# Altium PCB AmbientPro_Main_Board_V1.0.PcbDoc (part 4 of 5)
Units mm, origin at the board's own origin, x right, y up, seen from the top; angles counter-clockwise.
Board outline 100 x 100 mm, 4 copper layers (Top Layer, GND, PWR, Bottom Layer), stack 1.566 mm thick; 176 components, 124 nets, 570 pads, 283 vias.
Unrouted connection lines stored in the file: 133.
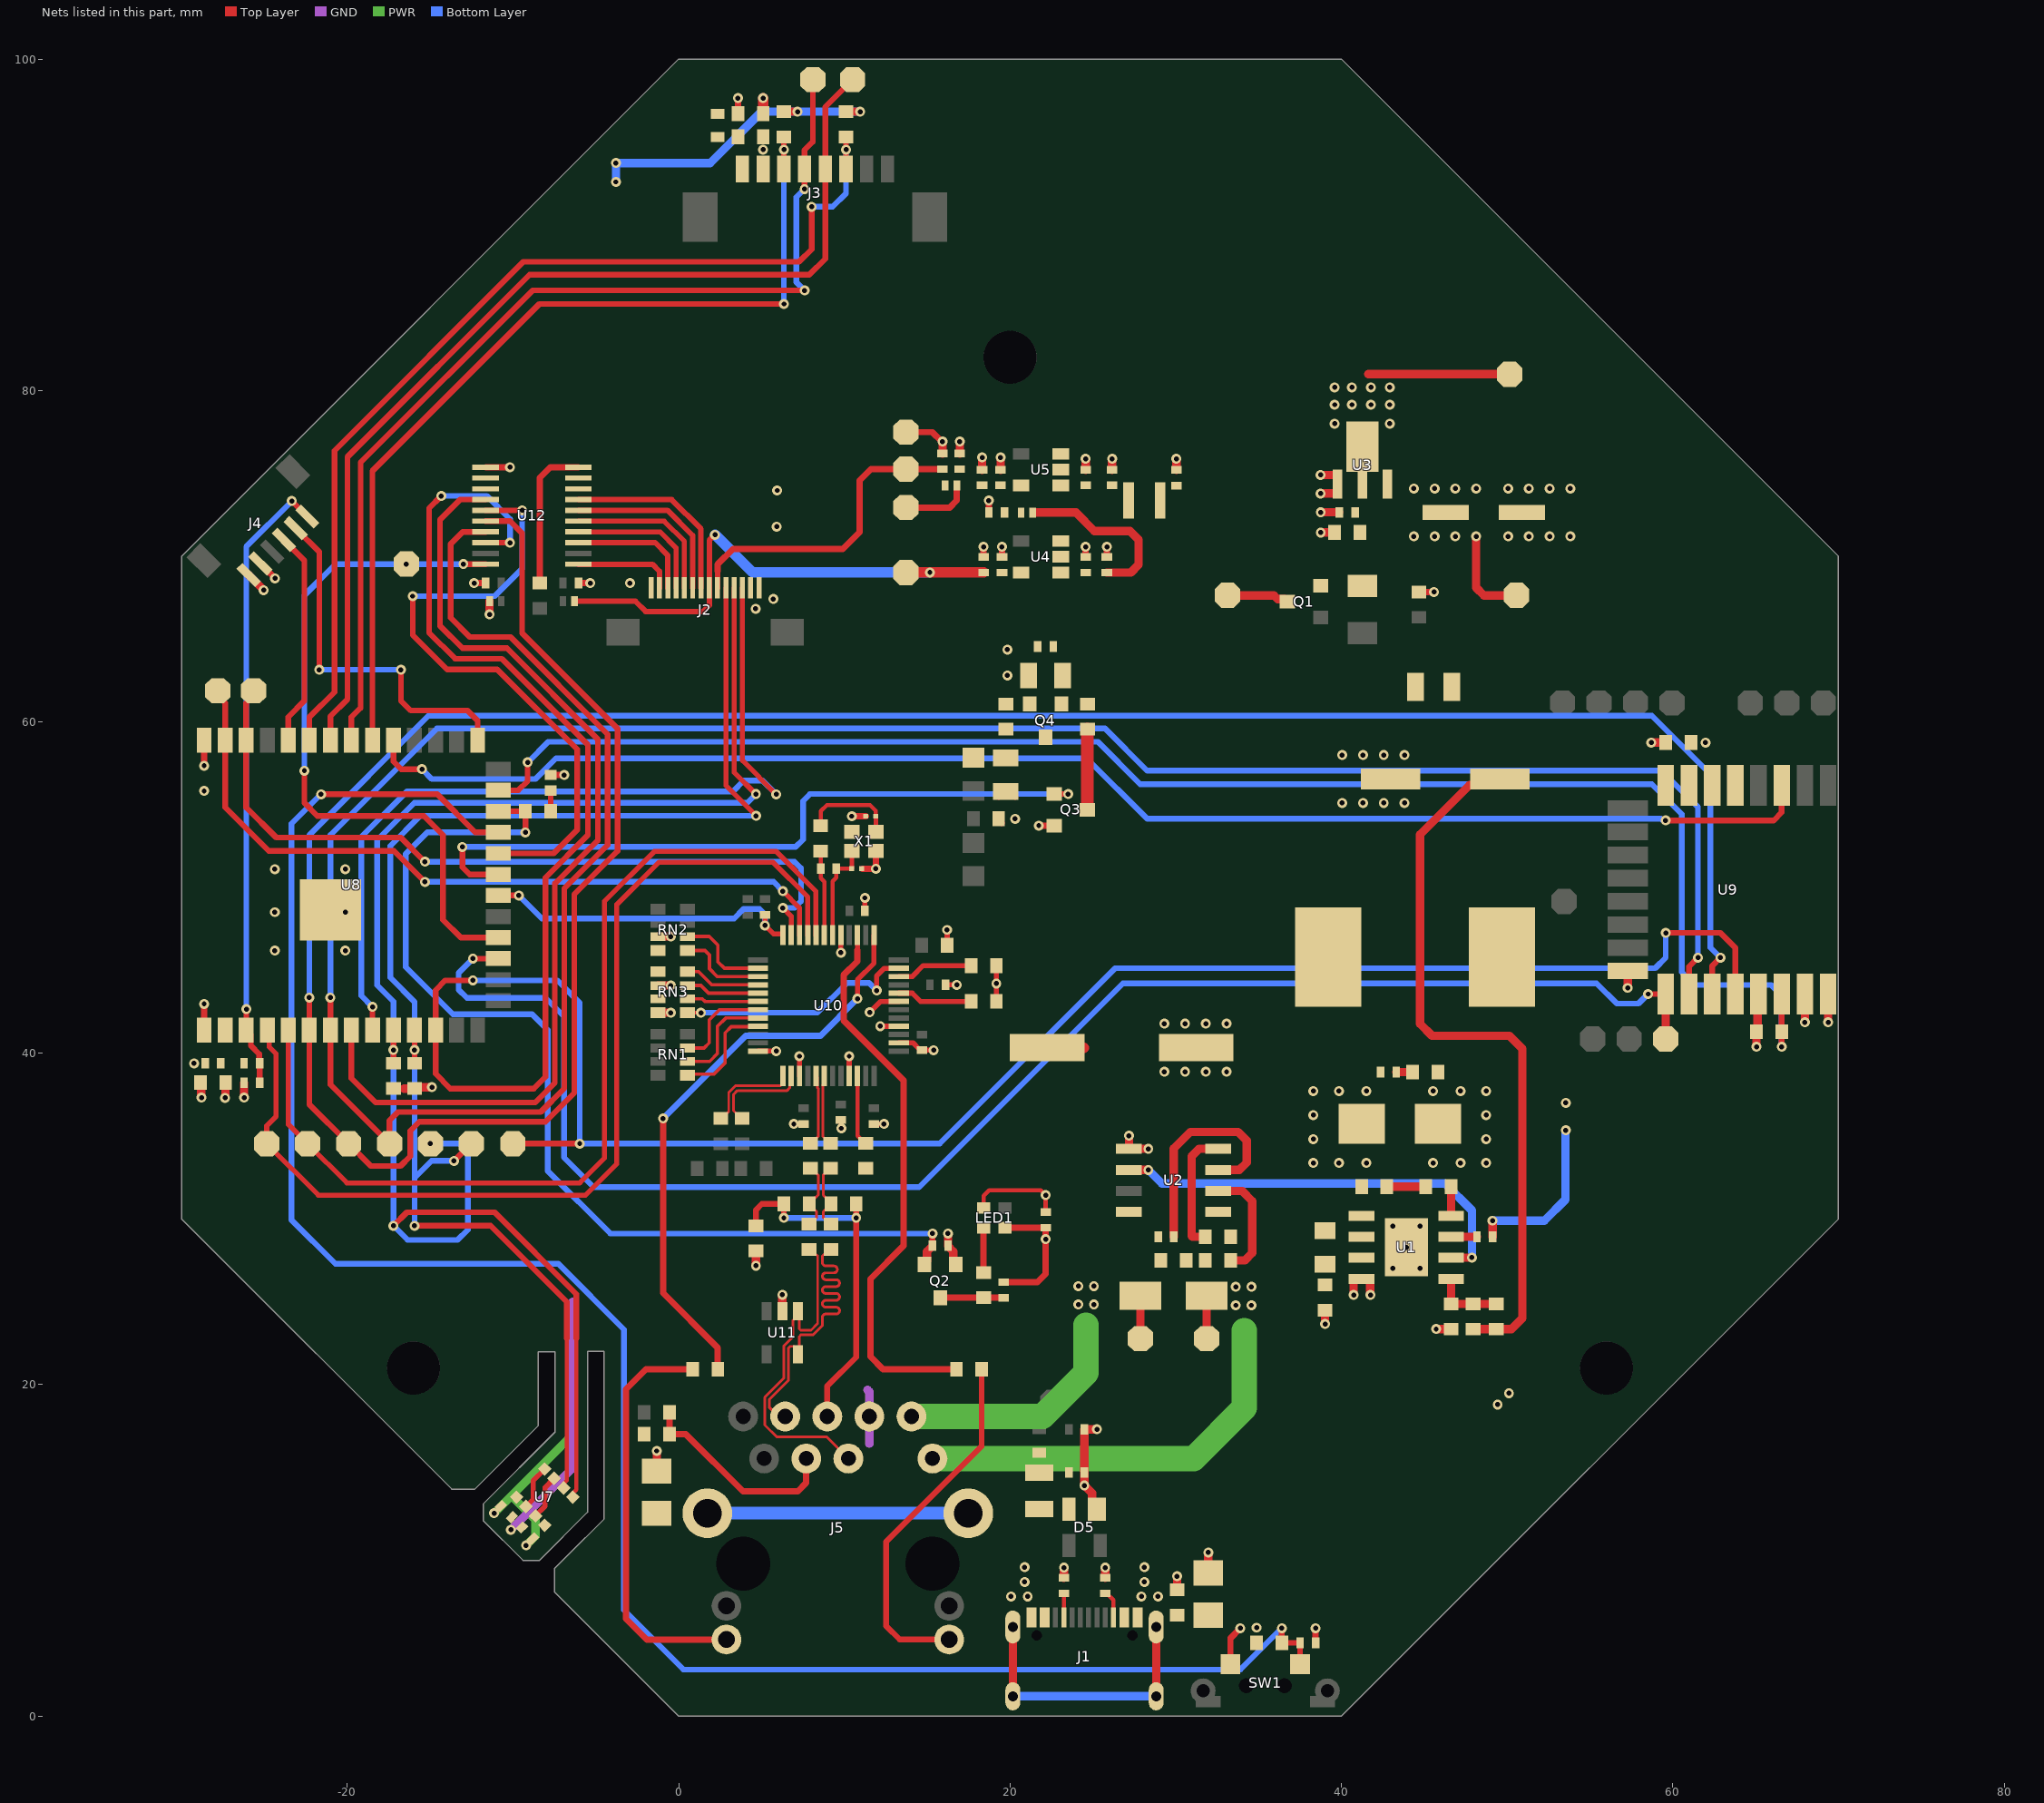
[diagram p4: the nets of this part, all layers, seen from the top]

## Via types
v1: diameter 0.6, hole 0.3, Top Layer to Bottom Layer, 283 vias

## Nets (pads, with @x,y where several pads share a name; then routed paths per layer and width w, separated by ;. In a path a pad name is that pad's centre, name@x,y a point inside that pad or via, vN(x,y) a via of type N, cw(c..) or ccw(c..) an arc to the next point about the centre after c; other vN are vias at no path point) (continued)
GND: (continued)
  Top Layer w0.508: C30.1@-28.866,38.227 -28.821,38.181 -28.821,37.346 v1(-28.803,37.328) ; v1(-26.231,37.328) C33.1@-26.231,38.227 ; C54.1@-1.321,14.78 v1(-1.321,16.002) ; RN3.4@-1.239,42.448 v1(-0.473,42.448) ; RN3.2@-1.239,44.088 v1(-0.475,44.088) ; RN2.3@-1.239,47.045 -1.237,47.043 -1.234,47.046 v1(-0.473,47.046) ; v1(4.664,27.178) C48.1@4.664,28.067 ; U11.2@6.254,24.444 v1(6.254,25.425) ; C17.1@15.926,76.187 v1(15.926,76.911) ; C23.1@16.967,76.187 v1(16.967,76.911) ; C22.1@18.313,75.209 v1(18.313,75.959) ; C21.1@19.431,75.209 v1(19.431,75.959) ; R12.1@23.246,8.344 23.251,8.349 23.251,8.948 v1(23.256,8.953) ; v1(24.486,13.919) C6.1@24.486,14.69 C7.1@24.486,17.304 v1(25.247,17.304) ; v1@24.504,13.902 24.951,13.455 24.951,12.786 D5.1@25.247,12.49 ; C20.1@24.562,75.209 v1(24.562,75.87) ; R11.1@25.746,8.344 v1(25.746,8.953) ; C19.1@26.162,75.209 v1(26.162,75.87) ; v1(27.178,35.027) 27.178,34.241 U2.5@27.168,34.232 v1(28.346,34.232) ; C18.1@30.038,75.201 v1(30.038,75.87) ; v1(30.074,8.433) 30.081,8.426 30.081,7.63 R13.2@30.088,7.623 ; C11.2@31.967,8.639 v1(31.967,9.881) ; v1(38.746,73.78) 39.731,73.78 39.731,74.899 v1(38.746,74.899) ; v1(38.751,71.426) C9.2@39.591,71.426 ; v1(38.751,72.645) C10.1@39.864,72.645 ; v1(39.016,23.664) R3.1@39.016,24.499 ; v1(40.741,25.417) 40.741,26.34 40.787,26.386 U1.4@41.222,26.386 41.697,26.386 41.743,26.34 41.743,25.431 v1(41.757,25.417) ; v1(45.72,23.36) 45.724,23.356 46.618,23.356 R8.1@46.622,23.352 ; v1(57.282,43.942) U9.16@57.282,44.967 ; v1(58.699,58.75) C35.2@59.577,58.75 ; v1(65.053,40.386) R25.1@65.053,41.3 65.115,41.362 65.115,43.51 U9.21@65.177,43.572 ; v1(67.977,41.868) U9.23@67.977,43.572 ; v1(69.377,41.868) U9.24@69.377,43.572
  Top Layer w0.635: C25.1@5.1,96.701 v1(5.1,97.638)
  GND w0.508: v1(-10.129,11.248) -6.484,14.894 -6.484,24.911 -6.401,24.994 ; 11.405,19.685 11.51,19.58 J5.7@11.51,18.08 11.51,16.44
  other v1: 20.061,7.214 28.931,7.214 21.063,7.216 27.928,7.216 45.537,33.376 47.189,33.376 48.74,33.376 48.74,34.823 48.74,36.271 45.537,37.719 47.189,37.719 48.74,37.719 29.312,38.887 30.565,38.887 31.818,38.887 33.071,38.887 -29.247,39.395 29.312,41.783 30.565,41.783 31.818,41.783 33.071,41.783 19.174,44.208 -24.384,46.198 -20.117,46.198 -24.384,48.514 -20.117,48.514 -24.384,51.105 -20.117,51.105 20.308,54.153 40.051,55.102 41.304,55.102 42.557,55.102 43.81,55.102 -28.644,55.829 40.051,57.998 41.304,57.998 42.557,57.998 43.81,57.998 4.639,66.826 5.715,67.412 50.062,71.189 51.315,71.189 52.568,71.189 53.821,71.189 5.918,71.78 5.944,73.965 50.062,74.085 51.315,74.085 52.568,74.085 53.821,74.085 5.1,94.539
GPIO12: R36.2 U8.20 U10.36 | length 19.7
  Top Layer w0.305: v1@5.204,47.719 R36.2@5.204,48.36 ; v1(5.207,47.719) 5.722,47.204 6.282,47.204 6.282,47.135 U10.36@6.29,47.128
  Top Layer w0.345: U8.20@-10.884,49.521 v1(-9.652,49.521)
  Bottom Layer w0.345: v1(-9.652,49.521) -8.264,48.133 3.342,48.133 3.913,48.703 4.889,48.703 5.207,48.385 v1(5.207,47.719)
GPIO13: Q3.1 U8.21 | length 43.7
  Top Layer w0.345: v1(-13.056,52.451) -13.056,51.231 -12.616,50.791 U8.21@-10.884,50.791 ; Q3.1@22.672,55.643 v1(23.505,55.643)
  Bottom Layer w0.345: v1(-13.056,52.451) 7.062,52.451 7.512,52.901 7.512,55.225 7.929,55.643 v1(23.505,55.643)
GPIO16: J2.12 U8.9 | length 52
  Top Layer w0.305: J2.12@3.845,68.092 3.845,57.674 v1(5.893,55.626)
  Top Layer w0.345: U8.9@-18.484,41.401 v1(-18.484,42.799)
  Bottom Layer w0.345: v1(-18.484,42.799) -19.155,43.471 -19.155,53.05 -16.402,55.804 3.279,55.804 3.934,56.46 5.059,56.46 v1(5.893,55.626)
GPIO21: C34.2 R21.1 SW1.1 U8.23 | length 123.7
  Top Layer w0.345: v1(-21.59,55.626) -14.569,55.626 -12.274,53.331 U8.23@-10.884,53.331 ; v1(36.404,5.306) R21.1@36.404,4.42 C34.2@37.503,4.42 SW1.1@37.503,2.725
  Bottom Layer w0.345: v1(-21.59,55.626) -23.368,53.848 -23.368,29.937 -20.719,27.288 -7.257,27.288 -3.302,23.332 -3.302,6.401 0.29,2.808 33.907,2.808 v1(36.404,5.306)
GPIO38: U8.31 U9.3 | length 89.4
  Top Layer w0.345: U8.31@-17.214,58.901 -17.214,57.6 -16.755,57.141 v1(-15.494,57.141) ; v1(59.563,54.051) 66.093,54.051 66.577,54.535 U9.3@66.577,56.162
  Bottom Layer w0.345: v1(-15.494,57.141) -14.904,56.552 -8.65,56.552 -7.402,57.8 24.632,57.8 28.282,54.151 59.283,54.151 59.334,54.1 59.514,54.1 v1(59.563,54.051)
GPIO39: J3.3 R15.2 U8.32 | length 56.5
  Top Layer w0.345: U8.32@-18.484,58.901 -18.484,75.141 -8.407,85.217 v1(6.35,85.217) ; J3.3@6.35,93.365 v1(6.35,94.539) R15.2@6.35,95.301
  Bottom Layer w0.345: v1(6.35,85.217) v1(6.35,94.539)
GPIO40: J3.4 P12.1 U8.33 | length 61.4
  Top Layer w0.345: U8.33@-19.754,58.901 -19.754,60.282 -19.202,60.833 -19.202,75.642 -8.807,86.037 v1@7.569,86.037 ; v1(7.595,92.151) 7.597,92.154 J3.4@7.597,93.365 ; J3.4@7.6,93.365 7.6,94.502 8.095,94.997 P12.1@8.095,98.755
  Bottom Layer w0.345: v1(7.595,92.151) 7.105,91.662 7.105,86.532 v1(7.6,86.037)
GPIO41: J3.5 P11.1 U8.34 | length 62.8
  Top Layer w0.345: U8.34@-21.024,58.901 -21.024,60.332 -19.99,61.366 -19.99,75.991 -9.004,86.977 7.881,86.977 8.85,87.946 J3.5@8.85,93.365 8.85,97.105 P11.1@10.5,98.755
GPIO42: J3.6 R14.2 U8.35 | length 61.5
  Top Layer w0.345: U8.35@-22.294,58.901 -22.294,60.282 -20.777,61.798 -20.777,76.363 -9.376,87.764 7.272,87.764 8.026,88.519 v1(8.026,91.084) ; J3.6@10.1,93.365 v1(10.1,94.539) R14.2@10.1,95.301
  Bottom Layer w0.345: v1(8.026,91.084) 9.296,91.084 10.1,91.888 v1(10.1,94.539)
GPIO47: Q2.2 R18.2 R22.1 U8.24 | length 62.9
  Top Layer w0.344: U8.24@-10.884,54.601 R22.1@-9.251,54.601 v1(-9.251,53.331)
  Top Layer w0.345: R18.2@15.316,28.397 v1(15.316,29.119)
  Top Layer w0.508: Q2.2@14.836,27.248 14.836,27.298 14.992,27.454 14.992,28.035 R18.2@15.291,28.334
  Bottom Layer w0.344: v1(-9.251,53.331) -15.17,53.331 -16.471,52.031 -16.471,45.201 -13.622,42.353 -8.848,42.353 -7.899,41.404 -7.899,32.893 -4.126,29.119 v1(15.316,29.119)
GPIO48: R25.2 U8.25 U9.22 | length 97.5
  Top Layer w0.345: U8.25@-10.884,55.871 -9.683,55.871 -9.119,56.436 v1(-9.119,57.556) ; v1(66.577,40.386) R25.2@66.577,41.3 U9.22@66.577,43.572
  Bottom Layer w0.345: v1(-9.119,57.556) -7.88,58.795 25.305,58.795 27.861,56.238 58.74,56.238 60.554,54.424 60.554,44.904 61.337,44.12 65.938,44.12 66.577,43.481 v1(66.577,40.386)
IO0: J4.5 U8.27 | length 22.2
  Top Layer w0.345: J4.5@-23.123,71.685 -21.692,70.254 v1(-21.692,63.144) ; v1(-16.764,63.144) -16.764,61.282 -16.163,60.681 -12.737,60.681 -12.134,60.078 U8.27@-12.134,58.901
  Bottom Layer w0.345: v1(-21.692,63.144) v1(-16.764,63.144)
LAN_PWR_N: C3.1 D2.2 J5.10 P3.1 R6.1 R7.1 U2.4 | length 34.8
  Top Layer w0.508: R6.1@31.793,28.923 31.011,28.923 30.957,28.977 30.957,33.783 31.416,34.241 32.559,34.241 U2.4@32.568,34.232 ; P3.1@31.868,22.776 D2.2@31.868,25.367
  PWR w1.524: J5.10@15.32,15.54 31.085,15.54 34.14,18.595 34.14,23.27
  other v1: 33.63,24.79 34.569,24.79 33.63,25.908 34.569,25.908
LAN_PWR_P: C2.1 C3.2 D2.1 J5.9 P1.1 R2.2 R3.2 R4.2 U1.3 U2.8 | length 19.3
  Top Layer w0.508: P1.1@27.868,22.776 D2.1@27.868,25.367
  Top Layer w0.635: C2.1@22.241,40.335 C2.1@24.46,40.335
  PWR w1.524: J5.9@14.05,18.08 21.961,18.08 24.587,20.706 24.587,23.597
  other v1: 24.121,24.834 25.061,24.834 24.121,25.951 25.061,25.951
NetC1_1: C1.1 D3.2 L1.1 R16.2 U1.1
  other v1: 38.303,33.376 39.854,33.376 41.506,33.376 38.303,34.823 38.303,36.271 38.303,37.719 39.854,37.719 41.506,37.719
NetC1_2: C1.2 R1.1 | length 2.4
  Top Layer w0.508: C1.2@42.746,31.948 R1.1@45.098,31.948
NetC4_1: C4.1 R5.1 R8.2 U1.5 | length 4.2
  Top Layer w0.508: U1.5@46.622,26.386 R8.2@46.622,24.876 R5.1@47.953,24.876 C4.1@49.35,24.876
NetC4_2: C4.2 C5.1 F1.1 L1.2 R5.2 | length 43.9
  Top Layer w0.508: R5.2@47.953,23.352 C4.2@49.35,23.352 50.266,23.352 50.927,24.012 50.927,40.278 50.146,41.059 45.474,41.059 44.754,41.779 44.754,53.193 47.735,56.174 49.194,56.174 C5.1@49.57,56.55
NetC6_2: C6.2 F2.2 FB1.1
NetC11_1: C11.1 J1.S1 J1.S2 J1.S3 J1.S4 R13.1 | length 17
  Top Layer w0.508: J1.S3@20.171,1.197 J1.S4@20.171,5.377 ; J1.S2@28.821,1.197 J1.S1@28.821,5.377
  Bottom Layer w0.508: J1.S3@20.171,1.197 J1.S2@28.821,1.197
NetC13_2: C13.2 C14.2 FB2.2 U4.1 U4.3 | length 10.6
  Top Layer w0.508: FB2.2@21.438,72.631 23.977,72.631 25.094,71.514 27.24,71.514 27.762,70.991 27.762,69.486 27.288,69.012 C13.2@25.845,69.012
NetC19_2: C19.2 C20.2 L2.2 U5.1 U5.3
NetC24_2: C24.2 FB4.2 J3.1
NetC28_2: C28.2 R16.1 | length 1
  Top Layer w0.508: R16.1@43.307,38.862 C28.2@44.298,38.862
NetC36_1: C36.1 Q4.1 R26.1 R27.2
NetC37_2: C37.2 FB5.1 Q4.3 R28.2
NetC46_2: C46.2 R29.1 R33.2 | length 4.3
  Top Layer w0.16: C46.2@7.872,29.686 7.935,29.686 8.316,30.067 8.316,30.447 8.223,30.541 8.173,30.541 7.872,30.842 7.872,30.969 8.173,31.27 8.236,31.27 8.438,31.471 8.438,32.624 8.013,33.048 R29.1@7.95,33.048
NetC47_2: C47.2 R30.1 R32.2 | length 4.2
  Top Layer w0.16: R30.1@9.169,33.048 9.106,33.048 8.725,32.667 8.725,31.434 9.19,30.969 9.19,30.842 8.889,30.541 8.825,30.541 8.725,30.44 8.725,30.088 9.126,29.686 C47.2@9.19,29.686
NetC48_2: C48.2 J5.5 R32.1 R33.1 | length 21.5
  Top Layer w0.345: C48.2@4.664,29.591 4.664,30.541 5.028,30.905 R33.1@6.348,30.905 v1(6.348,30.067) ; J5.5@8.97,18.08 8.97,19.916 10.714,21.659 v1(10.714,30.067) R32.1@10.714,30.905
  Bottom Layer w0.345: v1(6.348,30.067) v1(10.714,30.067)
NetC49_1: C49.1 J5.4 R39.1 | length 12.7
  Top Layer w0.381: R39.1@-0.559,18.334 C49.1@-0.559,17.018 0.421,17.018 3.873,13.566 7.195,13.566 7.7,14.071 J5.4@7.7,15.54
NetC50_2: C50.2 U10.22 | length 4.6
  Top Layer w0.305: U10.22@13.29,44.628 14.103,44.628 14.763,45.288 C50.2@17.65,45.288
NetC51_2: C51.2 U10.20 | length 4.6
  Top Layer w0.305: U10.20@13.291,43.627 14.096,43.627 14.595,43.128 C51.2@17.65,43.128
NetC52_2: C52.2 R40.1 U10.30 X1.1 | length 6.1
  Top Layer w0.254: U10.30@9.29,47.128 9.29,50.367 9.512,50.59 R40.1@9.512,51.14 C52.2@10.452,51.14 X1.1@10.452,52.206
NetC53_2: C53.2 R42.1 X1.3 | length 5.8
  Top Layer w0.254: R42.1@8.573,53.73 8.586,53.743 8.586,54.621 8.951,54.986 11.55,54.986 11.901,54.635 11.901,54.328 11.902,54.327 X1.3@11.902,53.356
NetC54_2: "J5.Shield 1" "J5.Shield 2" C54.2 | length 15.8
  Bottom Layer w0.762: 1.73,12.24 17.48,12.24
NetD5_2: D5.2 F2.1 J1.A4/B9 J1.B4/A9
  other v1: 20.882,8.093 28.11,8.093 20.882,8.992 28.11,8.992
NetJ1_A5: J1.A5 R12.2 | length 1.5
  Top Layer w0.254: J1.A5@23.246,5.947 R12.2@23.246,7.404
NetJ1_B5: J1.B5 R11.2 | length 1.7
  Top Layer w0.254: R11.2@25.746,7.404 25.835,7.404 26.242,6.997 26.242,5.951 J1.B5@26.246,5.947
NetJ5_12: J5.12 R41.1 | length 24.9
  Top Layer w0.381: R41.1@0.838,20.93 -1.971,20.93 -3.175,19.726 -3.175,5.873 -1.922,4.62 J5.12@2.88,4.62
NetJ5_14: J5.14 R43.1 | length 22
  Top Layer w0.345: J5.14@16.33,4.62 13.332,4.62 12.522,5.43 12.522,10.525 18.288,16.291 R43.1@18.288,20.93
NetLED1_4: LED1.4 R20.2 | length 2.7
  Top Layer w0.381: R20.2@18.403,26.772 LED1.4@18.403,29.469
NetLED2_1: LED2.1 R22.2 | length 1.2
  Top Layer w0.345: R22.2@-7.727,54.601 LED2.1@-7.727,55.846
NetQ2_3: Q2.3 R19.2 R20.1 | length 3.8
  Top Layer w0.381: Q2.3@15.786,25.248 R20.1@18.403,25.248 R19.2@19.609,25.248
NetQ3_3: Q3.3 R26.2 | length 4.9
  Top Layer w0.762: Q3.3@24.672,54.693 R26.2@24.672,59.554
NetR1_2: R1.2 U1.8 | length 1.8
  Top Layer w0.508: U1.8@46.622,30.196 R1.2@46.622,31.948
NetR2_1: R2.1 U2.3 | length 13.6
  Top Layer w0.508: R2.1@29.881,28.923 29.881,34.25 30.886,35.255 33.757,35.255 34.283,34.728 34.283,33.409 33.836,32.962 U2.3@32.568,32.962
NetR4_1: R4.1 U1.2 U1.9
  other v1: 43.104,27.024 44.74,27.024 43.922,28.291 43.104,29.557 44.74,29.557
NetR6_2: R6.2 U2.1
NetR7_2: R7.2 U2.2 | length 6.9
  Top Layer w0.508: U2.2@32.568,31.692 34.008,31.692 34.62,31.08 34.62,27.946 34.175,27.501 R7.2@33.317,27.501
NetR29_2: R29.2 U10.5 | length 4.3
  Top Layer w0.16: R29.2@7.95,34.572 8.013,34.572 8.421,34.979 8.421,37.862 8.372,37.911 8.372,38.004 8.37,38.006 8.37,38.548 U10.5@8.29,38.628
NetR30_2: R30.2 U10.6 | length 4.3
  Top Layer w0.16: U10.6@8.79,38.628 8.79,38.178 8.708,38.096 8.708,34.97 9.106,34.572 R30.2@9.169,34.572
NetR31_2: R31.2 U10.1 | length 5.7
  Top Layer w0.16: R31.2@2.544,36.071 2.608,36.071 3.021,36.483 3.021,37.632 3.427,38.038 6.151,38.038 6.29,38.178 U10.1@6.29,38.628
NetR34_2: R34.2 U10.2 | length 6
  Top Layer w0.16: R34.2@3.833,36.071 3.769,36.071 3.308,36.532 3.308,37.513 3.546,37.751 6.548,37.751 6.71,37.913 6.71,38.548 U10.2@6.79,38.628
NetR40_2: R40.2 R42.2 U10.31 | length 5.2
  Top Layer w0.254: R42.2@8.573,52.206 8.573,50.571 8.79,50.354 U10.31@8.79,47.128
NetR41_2: R41.2 U10.25 | length 35.5
  Top Layer w0.305: v1(10.79,43.288) 10.79,44.434 11.79,45.434 U10.25@11.79,47.128
  Top Layer w0.381: v1(-0.94,36.068) -0.94,25.526 2.362,22.224 R41.2@2.362,20.93
  Bottom Layer w0.381: v1(-0.94,36.068) 4.056,41.064 8.566,41.064 v1(10.79,43.288)
NetR43_2: R43.2 U10.27 | length 33.6
  Top Layer w0.305: 10.79,46.233 U10.27@10.79,47.128
  Top Layer w0.381: 10.79,46.233 10.79,45.552 9.95,44.712 9.95,41.979 13.564,38.366 13.564,28.374 11.571,26.382 11.571,21.689 12.331,20.93 R43.2@16.764,20.93
NetR44_2: R44.2 U10.10 | length 4.3
  Top Layer w0.254: U10.10@10.79,38.628 10.79,35.008 11.226,34.572 R44.2@11.29,34.572
NetR45_1: R45.1 U12.10 | length 8.9
  Top Layer w0.381: R45.1@-8.387,68.377 -8.387,74.722 -7.745,75.364 U12.10@-6.05,75.364
NetRN1_1: RN1.1 U10.45 | length 6.5
  Top Layer w0.203: RN1.1@0.531,38.672 0.601,38.742 2.133,38.742 2.801,39.411 2.801,41.226 3.175,41.599 4.761,41.599 U10.45@4.79,41.628
NetRN1_2: RN1.2 U10.44 | length 6.3
  Top Layer w0.203: RN1.2@0.531,39.512 1.868,39.512 2.337,39.982 2.337,41.626 2.839,42.128 U10.44@4.79,42.128
NetRN1_3: RN1.3 U10.43 | length 6
  Top Layer w0.203: RN1.3@0.531,40.312 1.53,40.312 1.846,40.628 1.846,42.017 2.457,42.628 U10.43@4.79,42.628
NetRN2_5: RN2.5 U10.39 | length 5.4
  Top Layer w0.203: RN2.5@0.531,46.205 1.581,46.205 1.853,45.934 1.853,45.1 2.324,44.628 U10.39@4.79,44.628
NetRN2_6: RN2.6 U10.38 | length 5.6
  Top Layer w0.203: RN2.6@0.531,47.045 1.846,47.045 2.368,46.523 2.368,45.516 2.757,45.128 U10.38@4.79,45.128
NetRN3_5: RN3.5 U10.23 | length 14.8
  Top Layer w0.203: RN3.5@0.531,42.448 v1(1.34,42.448)
  Top Layer w0.305: v1(11.949,43.79) 11.949,44.665 12.412,45.128 U10.23@13.29,45.128
  Bottom Layer w0.345: v1(1.34,42.448) 8.361,42.448 10.158,44.245 11.494,44.245 v1(11.949,43.79)
NetRN3_6: RN3.6 U10.42 | length 4.3
  Top Layer w0.203: RN3.6@0.531,43.288 1.417,43.288 1.577,43.128 U10.42@4.79,43.128
NetRN3_7: RN3.7 U10.41 | length 4.4
  Top Layer w0.203: RN3.7@0.531,44.088 1.34,44.088 1.8,43.628 U10.41@4.79,43.628
NetRN3_8: RN3.8 U10.40 | length 4.6
  Top Layer w0.203: RN3.8@0.531,44.928 1.206,44.928 2.006,44.128 U10.40@4.79,44.128
NetU1_6: U1.6 U2.6 | length 25.8
  Top Layer w0.508: U2.6@27.168,32.962 v1(28.346,32.962) ; U1.6@46.622,27.656 46.633,27.667 47.868,27.667 v1(47.879,27.678)
  Bottom Layer w0.508: v1(28.346,32.962) 29.162,32.146 46.248,32.146 47.879,30.516 v1(47.879,27.678)
RD_N: C46.1 J5.6 U11.1 | length 20.8
  Top Layer w0.16: C46.1@7.872,28.162 8.173,27.861 8.293,27.861 8.387,27.768 8.387,23.69 7.984,23.288 7.711,23.288 7.368,23.288 7.274,23.381 7.274,24.194 7.204,24.265 U11.1@7.204,24.444 7.204,24.373 7.204,24.194 6.904,23.894 6.904,22.897 6.345,22.339 6.345,21.223 6.345,20.393 5.196,19.244 5.196,17.569 5.919,16.846 8.934,16.846 J5.6@10.24,15.54
RD_P: C47.1 J5.3 U11.5 | length 20.3
  Top Layer w0.16: J5.3@6.43,18.08 6.016,18.08 5.483,18.613 5.483,19.125 6.632,20.274 6.632,21.341 6.632,22.22 6.726,22.314 6.984,22.314 7.204,22.094 U11.5@7.204,21.844 U11.5@7.204,21.915 ; U11.5@7.204,22.023 7.274,22.094 7.274,22.907 7.368,23 7.592,23 8.103,23 8.666,23.563 8.674,23.572 8.674,24.058 cw(c8.881,24.058) 8.881,24.265 9.501,24.265 ccw(c9.501,24.472) 9.708,24.472 ccw(c9.501,24.472) 9.501,24.679 8.881,24.679 cw(c8.881,24.886) 8.674,24.886 cw(c8.881,24.886) 8.881,25.093 9.501,25.093 ccw(c9.501,25.3) 9.708,25.3 ccw(c9.501,25.3) 9.501,25.507 8.881,25.507 cw(c8.881,25.714) 8.674,25.714 cw(c8.881,25.714) 8.881,25.921 9.501,25.921 ccw(c9.501,26.128) 9.708,26.128 ccw(c9.501,26.128) 9.501,26.335 8.881,26.335 cw(c8.881,26.542) 8.674,26.542 cw(c8.881,26.542) 8.881,26.749 9.369,26.749 ccw(c9.369,26.956) 9.576,26.956 ccw(c9.369,26.956) 9.369,27.163 8.881,27.163 cw(c8.881,27.37) 8.674,27.37 8.674,27.768 8.764,27.857 8.768,27.861 8.889,27.861 C47.1@9.19,28.162
RXD: J4.4 U8.36 | length 13
  Top Layer w0.345: J4.4@-23.83,70.978 -22.593,69.741 -22.593,61.263 -23.564,60.292 U8.36@-23.564,58.901
SCL: J2.11 P13.1 R23.1 U7.4 U8.10 | length 100.7
  Top Layer w0.254: U7.4@-6.387,13.247 -6.387,13.45 -6.179,13.658 -6.179,22.797
  Top Layer w0.305: J2.11@3.345,68.092 3.345,56.955 v1(4.665,55.635)
  Top Layer w0.345: v1(-17.214,29.591) -16.402,30.403 -11.112,30.403 -6.179,25.469 -6.179,22.797 ; R23.1@-17.214,39.395 v1(-17.214,40.198) U8.10@-17.214,41.401 ; U7.4@-6.387,13.212 U7.4@-6.387,13.247
  Bottom Layer w0.345: v1(-14.983,34.544) -13.244,34.544 -12.719,34.019 -12.719,29.355 -13.338,28.737 -16.359,28.737 v1(-17.214,29.591) v1(-17.214,40.198) -17.214,43.122 -18.196,44.104 -18.196,52.873 -15.957,55.112 4.142,55.112 v1(4.665,55.635)
SDA: J2.10 P15.1 R24.1 U7.3 U8.11 | length 89.6
  Top Layer w0.254: U7.3@-6.952,13.856 -6.952,14.022 -6.753,14.221 -6.753,22.797
  Top Layer w0.305: J2.10@2.845,68.092 2.845,56.159 v1(4.674,54.331)
  Top Layer w0.345: v1(-15.944,29.591) -11.354,29.591 -6.753,24.991 -6.753,22.797 ; R24.1@-15.944,39.395 v1(-15.944,40.198) U8.11@-15.944,41.401 ; v1(-13.564,33.503) -13.559,33.503 -12.517,34.544 P15.1@-12.512,34.544 ; U7.3@-6.952,13.778 U7.3@-6.952,13.856
  Bottom Layer w0.345: v1(-15.944,29.591) -15.944,32.469 ; v1(-13.564,33.503) -14.91,33.503 -15.944,32.469 ; v1(4.674,54.331) -15.596,54.331 -17.406,52.52 -17.406,44.572 -15.944,43.11 v1(-15.944,40.198) -15.944,32.469
SPI2_CS_IO5: P23.1 U8.5 U10.32 | length 60
  Top Layer w0.305: U8.5@-23.564,41.401 -23.564,35.712 P23.1@-22.396,34.544 -20.03,32.178 -5.973,32.178 -4.484,33.667 -4.484,49.164 -1.462,52.185 5.871,52.185 8.29,49.767 U10.32@8.29,47.128
SPI2_MISO_IO1: P17.1 U8.39 U10.34 | length 46
  Top Layer w0.305: v1(6.282,49.784) 7.29,48.776 U10.34@7.29,47.128
  Top Layer w0.345: P17.1@-27.824,61.874 -27.824,61.595 -27.374,61.145 U8.39@-27.374,58.901 -27.374,54.835 -24.742,52.204 -17.179,52.204 v1(-15.316,50.341)
  Bottom Layer w0.345: v1(-15.316,50.341) -12.827,50.341 5.725,50.341 v1(6.282,49.784)
SPI2_MOSI_IO2: P19.1 U8.38 U10.35 | length 47.4
  Top Layer w0.305: v1(6.282,48.774) 6.79,48.267 U10.35@6.79,47.128
  Top Layer w0.345: P19.1@-25.654,61.874 -25.654,61.595 -26.104,61.145 U8.38@-26.104,58.901 -26.104,54.831 -24.289,53.016 -16.771,53.016 v1(-15.316,51.562)
  Bottom Layer w0.345: v1(-15.316,51.562) 6.996,51.562 7.384,51.174 7.384,49.162 6.996,48.774 v1(6.282,48.774)
SPI2_SCK_IO4: P21.1 U8.4 U10.33 | length 61.9
  Top Layer w0.305: U8.4@-24.834,41.401 -24.704,41.271 -24.704,40.373 -24.295,39.964 -24.295,36.192 -24.867,35.621 P21.1@-24.867,34.544 -21.755,31.432 -5.628,31.432 -3.734,33.326 -3.734,48.979 -1.178,51.535 5.676,51.535 7.79,49.421 U10.33@7.79,47.128
SPI3_CS_UWB_IO9: P20.1 U8.17 U9.17 | length 95.1
  Top Layer w0.345: v1(-12.421,45.711) U8.17@-10.884,45.711 ; v1(58.507,43.572) U9.17@59.577,43.572
  Top Layer w0.508: P20.1@59.577,40.856 U9.17@59.577,43.572
  Bottom Layer w0.345: v1(-12.421,45.711) -13.284,44.848 -13.284,43.84 -12.776,43.332 -8.033,43.332 -6.917,42.216 -6.917,33.713 -5.128,31.924 14.512,31.924 26.811,44.223 55.397,44.223 56.624,42.997 57.932,42.997 v1(58.507,43.572)